# Altium PCB DSP大板子.PcbDoc (part 2 of 9)
Units mil, origin at the board's own origin, x right, y up, seen from the top; angles counter-clockwise.
Board outline 7874.02 x 9055.12 mil, 4 copper layers (Top Layer, GND02, PWR03, Bottom Layer), stack 23.756 mil thick; 656 components, 360 nets, 1967 pads, 2623 vias.
Unrouted connection lines stored in the file: 70.
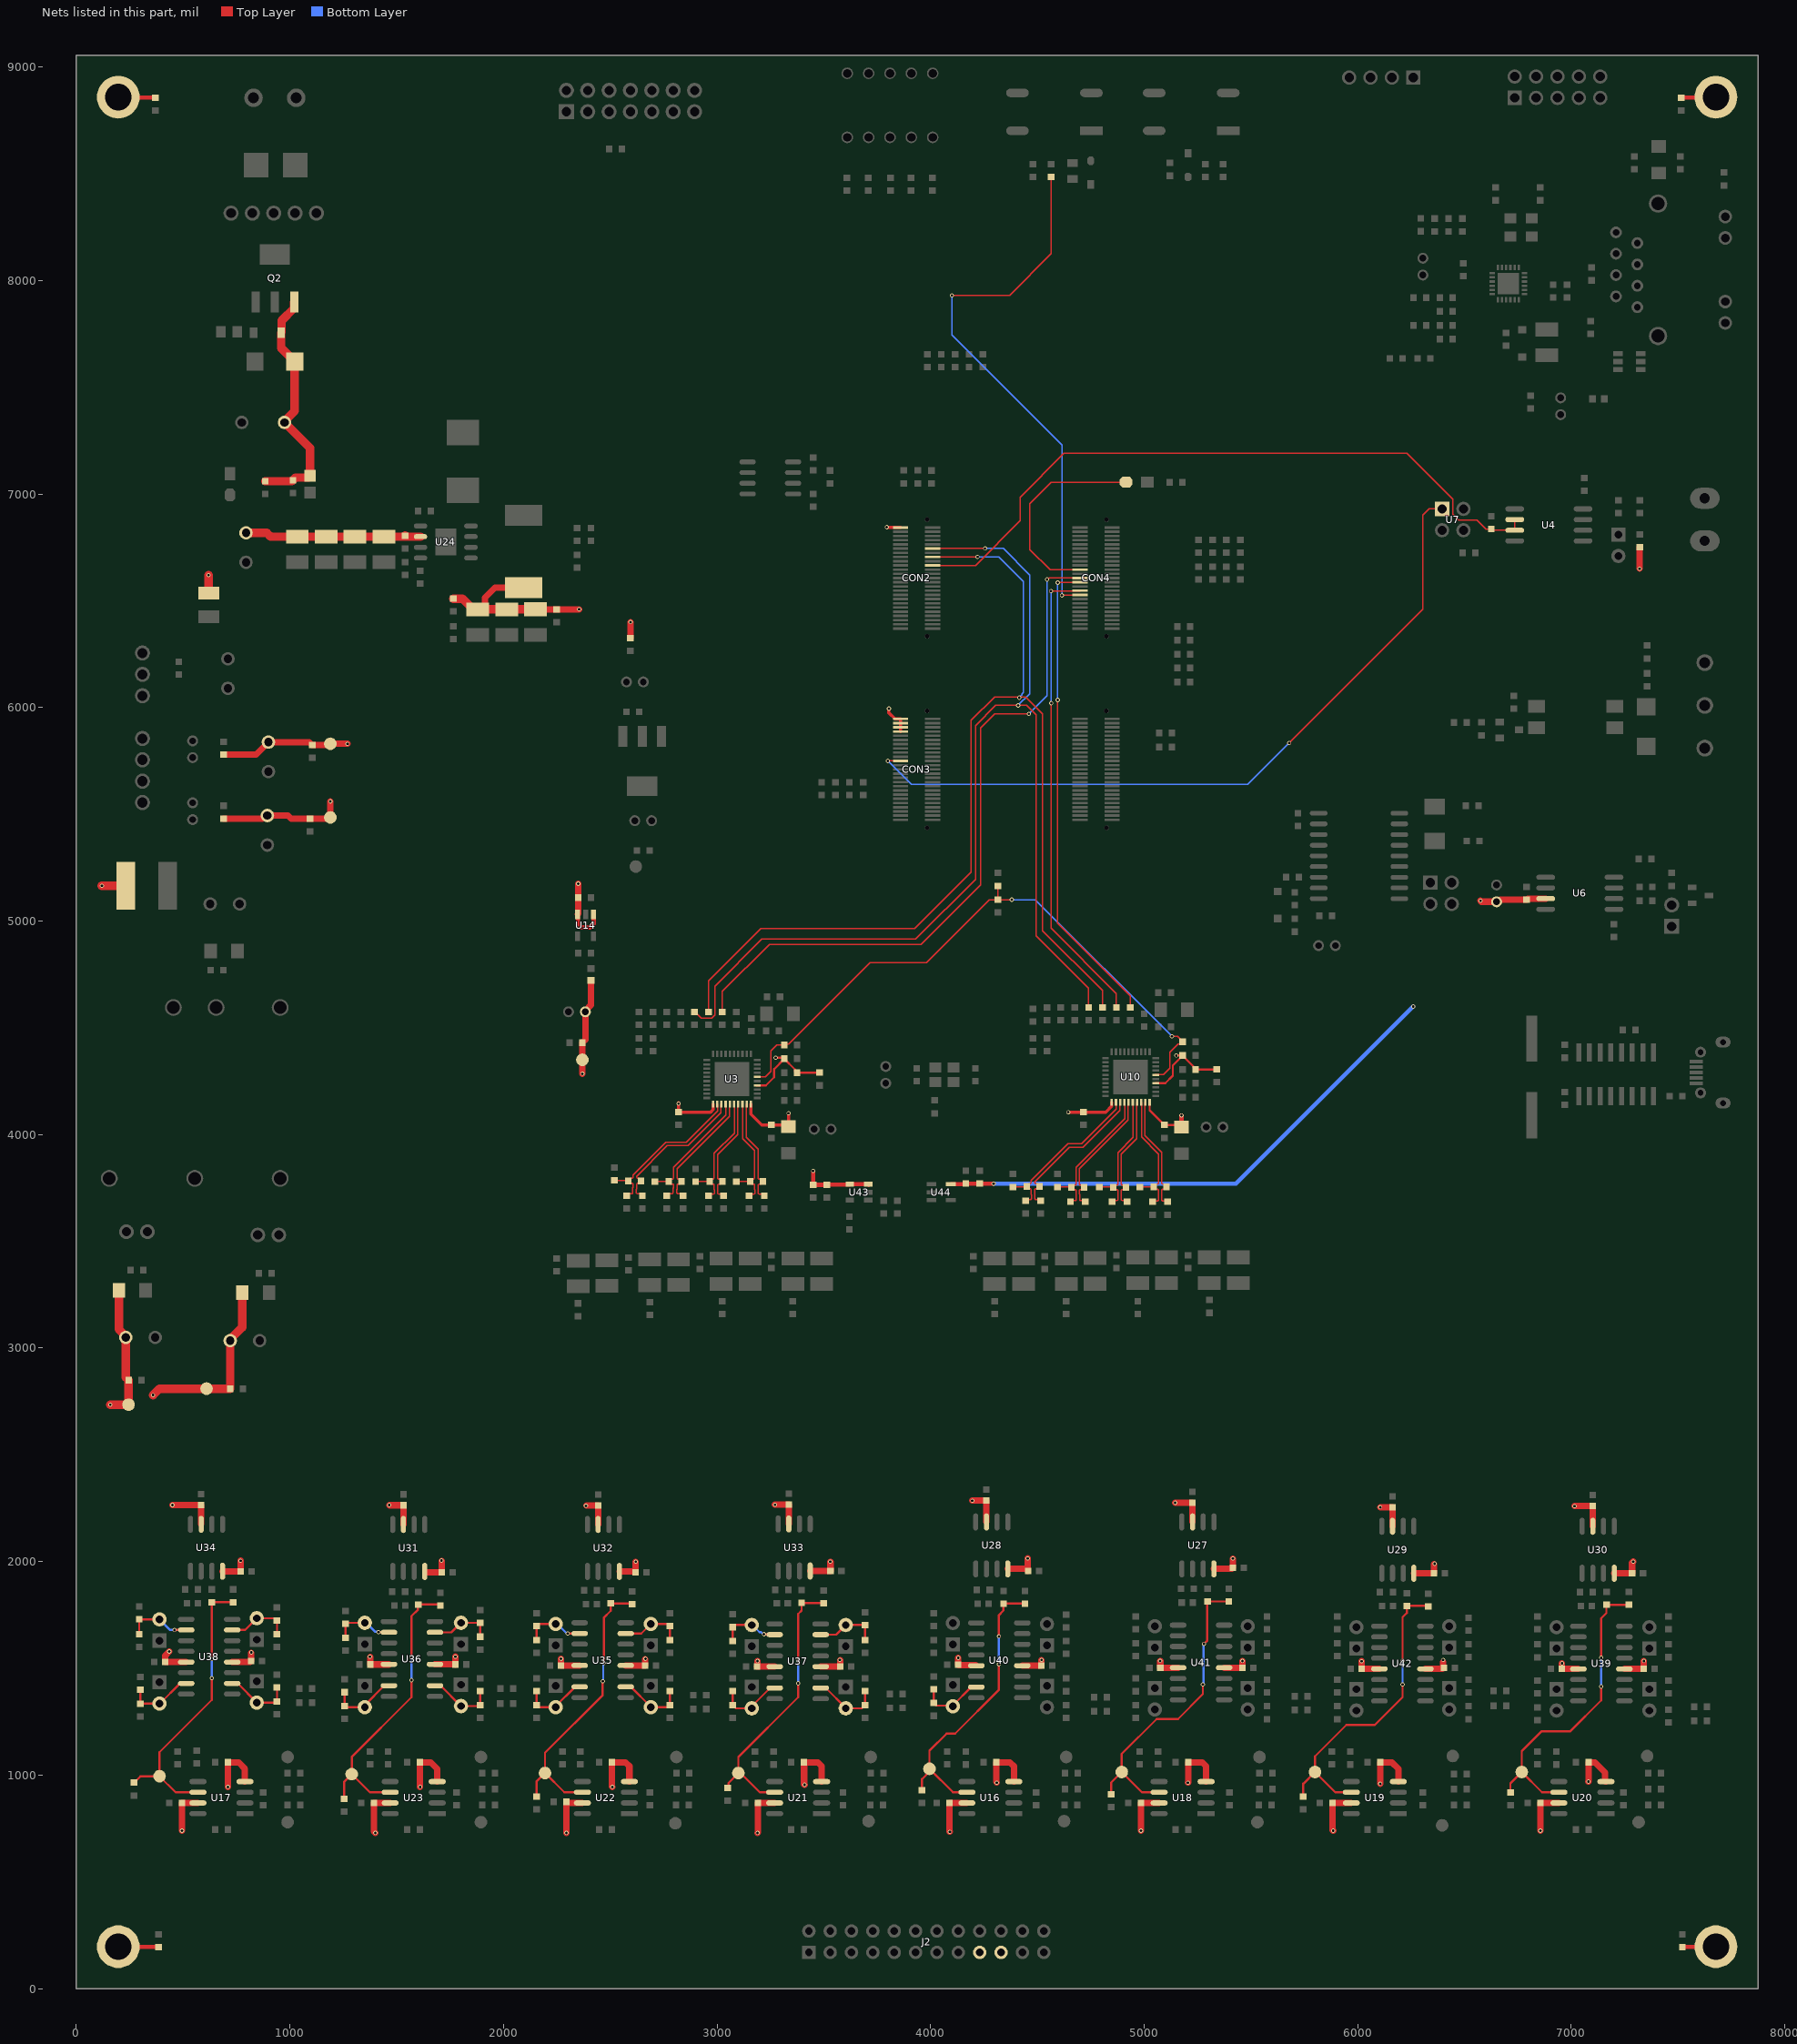
[diagram p4: the nets of this part, all layers, seen from the top]

## Part data
1 2 3 4 5 6 7 8 9 10 11 12 13 14 15 16 17 18 19 20 21 22 23 24 +12 +15 -1 -12 -15 T1: library part TEST-POINT, "测试点"
BOOT1: library part "5BIT DIP SOP Switch", Manufacturer=KE, Manufacturer PartNumber=DSWB05LHGET, Remark="5位直插拨码开关 红色,2.54mm"
C1 C17 C35 C36 C40 C76 C77 C87 C88 C89 C90 C91 C92 C93 C94 C95 C96 C97 C98 C99 C100 C101 C107 C121 C122 C124 C125 C126 C127 C128 C129 C130 C131 C132 C133 C134 C135 C136 C137 C146 C147 C148 C149 C150 C151 C152 C153 C158 C159 C160 C161 C162 C163 C164 C165 C166 C167 C168 C169 C170 C171 C173 C174 C181 C182 C183 C184 C185 C186 C187 C188 C189 C190 C191 C192 C193 C194 C195 C196: library part C, "贴片电容", BOM名称=无极性贴片电容, 唯一出售店铺网址=https://shop463601444.taobao.com, 淘宝ID="封装库来自淘宝 ID：黄晶宝石", 联系售后，技术支持=https://shop463601444.taobao.com
  C146: AddInBom=yes, DesignItemID=C, Device=C, FootprintName="C 0603_L", LibraryName="0.1 - 电阻-电容-电感", Origin Footprint="C 0201_L", OriginFootprint 2="C 0402_L", OriginFootprint 3="C 0805_L", OriginFootprint 4="C 1206_L", OriginFootprint 5="C 1210_L", OriginFootprint 6="C 1808_L", OriginFootprint 7="C 1812_L", OriginFootprint 8="C 1825_L", OriginFootprint 9="C 2225_L", OriginFootprint 10="C 0201_M", OriginFootprint 11="C 0402_M", OriginFootprint 12="C 0603_M", OriginFootprint 13="C 0805_M", OriginFootprint 14="C 1206_M", OriginFootprint 15="C 1210_M", OriginFootprint 16="C 1808_M", OriginFootprint 17="C 1812_M", OriginFootprint 18="C 1825_M", OriginFootprint 19="C 2225_M", OriginModelName="C 0603", SymbolName=C, UniqueId=2b2365c2d0e3ae99
  C147: AddInBom=yes, DesignItemID=C, Device=C, FootprintName="C 0603_L", LibraryName="0.1 - 电阻-电容-电感", Origin Footprint="C 0201_L", OriginFootprint 2="C 0402_L", OriginFootprint 3="C 0805_L", OriginFootprint 4="C 1206_L", OriginFootprint 5="C 1210_L", OriginFootprint 6="C 1808_L", OriginFootprint 7="C 1812_L", OriginFootprint 8="C 1825_L", OriginFootprint 9="C 2225_L", OriginFootprint 10="C 0201_M", OriginFootprint 11="C 0402_M", OriginFootprint 12="C 0603_M", OriginFootprint 13="C 0805_M", OriginFootprint 14="C 1206_M", OriginFootprint 15="C 1210_M", OriginFootprint 16="C 1808_M", OriginFootprint 17="C 1812_M", OriginFootprint 18="C 1825_M", OriginFootprint 19="C 2225_M", OriginModelName="C 0603", SymbolName=C, UniqueId=2ac4a713bdb27458
  C148: AddInBom=yes, DesignItemID=C, Device=C, FootprintName="C 0603_L", LibraryName="0.1 - 电阻-电容-电感", Origin Footprint="C 0201_L", OriginFootprint 2="C 0402_L", OriginFootprint 3="C 0805_L", OriginFootprint 4="C 1206_L", OriginFootprint 5="C 1210_L", OriginFootprint 6="C 1808_L", OriginFootprint 7="C 1812_L", OriginFootprint 8="C 1825_L", OriginFootprint 9="C 2225_L", OriginFootprint 10="C 0201_M", OriginFootprint 11="C 0402_M", OriginFootprint 12="C 0603_M", OriginFootprint 13="C 0805_M", OriginFootprint 14="C 1206_M", OriginFootprint 15="C 1210_M", OriginFootprint 16="C 1808_M", OriginFootprint 17="C 1812_M", OriginFootprint 18="C 1825_M", OriginFootprint 19="C 2225_M", OriginModelName="C 0603", SymbolName=C, UniqueId=043006a40a259ae3
  C149: AddInBom=yes, DesignItemID=C, Device=C, FootprintName="C 0603_L", LibraryName="0.1 - 电阻-电容-电感", Origin Footprint="C 0201_L", OriginFootprint 2="C 0402_L", OriginFootprint 3="C 0805_L", OriginFootprint 4="C 1206_L", OriginFootprint 5="C 1210_L", OriginFootprint 6="C 1808_L", OriginFootprint 7="C 1812_L", OriginFootprint 8="C 1825_L", OriginFootprint 9="C 2225_L", OriginFootprint 10="C 0201_M", OriginFootprint 11="C 0402_M", OriginFootprint 12="C 0603_M", OriginFootprint 13="C 0805_M", OriginFootprint 14="C 1206_M", OriginFootprint 15="C 1210_M", OriginFootprint 16="C 1808_M", OriginFootprint 17="C 1812_M", OriginFootprint 18="C 1825_M", OriginFootprint 19="C 2225_M", OriginModelName="C 0603", SymbolName=C, UniqueId=ed052c5890e059ff
  C150: AddInBom=yes, DesignItemID=C, Device=C, FootprintName="C 0603_L", LibraryName="0.1 - 电阻-电容-电感", Origin Footprint="C 0201_L", OriginFootprint 2="C 0402_L", OriginFootprint 3="C 0805_L", OriginFootprint 4="C 1206_L", OriginFootprint 5="C 1210_L", OriginFootprint 6="C 1808_L", OriginFootprint 7="C 1812_L", OriginFootprint 8="C 1825_L", OriginFootprint 9="C 2225_L", OriginFootprint 10="C 0201_M", OriginFootprint 11="C 0402_M", OriginFootprint 12="C 0603_M", OriginFootprint 13="C 0805_M", OriginFootprint 14="C 1206_M", OriginFootprint 15="C 1210_M", OriginFootprint 16="C 1808_M", OriginFootprint 17="C 1812_M", OriginFootprint 18="C 1825_M", OriginFootprint 19="C 2225_M", OriginModelName="C 0603", SymbolName=C, UniqueId=e3aeb17489c0ab5d
  C151: AddInBom=yes, DesignItemID=C, Device=C, FootprintName="C 0603_L", LibraryName="0.1 - 电阻-电容-电感", Origin Footprint="C 0201_L", OriginFootprint 2="C 0402_L", OriginFootprint 3="C 0805_L", OriginFootprint 4="C 1206_L", OriginFootprint 5="C 1210_L", OriginFootprint 6="C 1808_L", OriginFootprint 7="C 1812_L", OriginFootprint 8="C 1825_L", OriginFootprint 9="C 2225_L", OriginFootprint 10="C 0201_M", OriginFootprint 11="C 0402_M", OriginFootprint 12="C 0603_M", OriginFootprint 13="C 0805_M", OriginFootprint 14="C 1206_M", OriginFootprint 15="C 1210_M", OriginFootprint 16="C 1808_M", OriginFootprint 17="C 1812_M", OriginFootprint 18="C 1825_M", OriginFootprint 19="C 2225_M", OriginModelName="C 0603", SymbolName=C, UniqueId=cc1d00c51cc12124
  C152: AddInBom=yes, DesignItemID=C, Device=C, FootprintName="C 0603_L", LibraryName="0.1 - 电阻-电容-电感", Origin Footprint="C 0201_L", OriginFootprint 2="C 0402_L", OriginFootprint 3="C 0805_L", OriginFootprint 4="C 1206_L", OriginFootprint 5="C 1210_L", OriginFootprint 6="C 1808_L", OriginFootprint 7="C 1812_L", OriginFootprint 8="C 1825_L", OriginFootprint 9="C 2225_L", OriginFootprint 10="C 0201_M", OriginFootprint 11="C 0402_M", OriginFootprint 12="C 0603_M", OriginFootprint 13="C 0805_M", OriginFootprint 14="C 1206_M", OriginFootprint 15="C 1210_M", OriginFootprint 16="C 1808_M", OriginFootprint 17="C 1812_M", OriginFootprint 18="C 1825_M", OriginFootprint 19="C 2225_M", OriginModelName="C 0603", SymbolName=C, UniqueId=d2625f4b4bd439ef
  C153: AddInBom=yes, DesignItemID=C, Device=C, FootprintName="C 0603_L", LibraryName="0.1 - 电阻-电容-电感", Origin Footprint="C 0201_L", OriginFootprint 2="C 0402_L", OriginFootprint 3="C 0805_L", OriginFootprint 4="C 1206_L", OriginFootprint 5="C 1210_L", OriginFootprint 6="C 1808_L", OriginFootprint 7="C 1812_L", OriginFootprint 8="C 1825_L", OriginFootprint 9="C 2225_L", OriginFootprint 10="C 0201_M", OriginFootprint 11="C 0402_M", OriginFootprint 12="C 0603_M", OriginFootprint 13="C 0805_M", OriginFootprint 14="C 1206_M", OriginFootprint 15="C 1210_M", OriginFootprint 16="C 1808_M", OriginFootprint 17="C 1812_M", OriginFootprint 18="C 1825_M", OriginFootprint 19="C 2225_M", OriginModelName="C 0603", SymbolName=C, UniqueId=a26eb100929f0697
  C158: AddInBom=yes, DesignItemID=C, Device=C, FootprintName="C 0603_L", LibraryName="0.1 - 电阻-电容-电感", Origin Footprint="C 0201_L", OriginFootprint 2="C 0402_L", OriginFootprint 3="C 0805_L", OriginFootprint 4="C 1206_L", OriginFootprint 5="C 1210_L", OriginFootprint 6="C 1808_L", OriginFootprint 7="C 1812_L", OriginFootprint 8="C 1825_L", OriginFootprint 9="C 2225_L", OriginFootprint 10="C 0201_M", OriginFootprint 11="C 0402_M", OriginFootprint 12="C 0603_M", OriginFootprint 13="C 0805_M", OriginFootprint 14="C 1206_M", OriginFootprint 15="C 1210_M", OriginFootprint 16="C 1808_M", OriginFootprint 17="C 1812_M", OriginFootprint 18="C 1825_M", OriginFootprint 19="C 2225_M", OriginModelName="C 0603", SymbolName=C, UniqueId=6158349470ed1956
  C159: AddInBom=yes, DesignItemID=C, Device=C, FootprintName="C 0603_L", LibraryName="0.1 - 电阻-电容-电感", Origin Footprint="C 0201_L", OriginFootprint 2="C 0402_L", OriginFootprint 3="C 0805_L", OriginFootprint 4="C 1206_L", OriginFootprint 5="C 1210_L", OriginFootprint 6="C 1808_L", OriginFootprint 7="C 1812_L", OriginFootprint 8="C 1825_L", OriginFootprint 9="C 2225_L", OriginFootprint 10="C 0201_M", OriginFootprint 11="C 0402_M", OriginFootprint 12="C 0603_M", OriginFootprint 13="C 0805_M", OriginFootprint 14="C 1206_M", OriginFootprint 15="C 1210_M", OriginFootprint 16="C 1808_M", OriginFootprint 17="C 1812_M", OriginFootprint 18="C 1825_M", OriginFootprint 19="C 2225_M", OriginModelName="C 0603", SymbolName=C, UniqueId=de488198406d19e5
  C160: AddInBom=yes, DesignItemID=C, Device=C, FootprintName="C 0603_L", LibraryName="0.1 - 电阻-电容-电感", Origin Footprint="C 0201_L", OriginFootprint 2="C 0402_L", OriginFootprint 3="C 0805_L", OriginFootprint 4="C 1206_L", OriginFootprint 5="C 1210_L", OriginFootprint 6="C 1808_L", OriginFootprint 7="C 1812_L", OriginFootprint 8="C 1825_L", OriginFootprint 9="C 2225_L", OriginFootprint 10="C 0201_M", OriginFootprint 11="C 0402_M", OriginFootprint 12="C 0603_M", OriginFootprint 13="C 0805_M", OriginFootprint 14="C 1206_M", OriginFootprint 15="C 1210_M", OriginFootprint 16="C 1808_M", OriginFootprint 17="C 1812_M", OriginFootprint 18="C 1825_M", OriginFootprint 19="C 2225_M", OriginModelName="C 0603", SymbolName=C, UniqueId=ac7cf9eb5671d2c3
  C161: AddInBom=yes, DesignItemID=C, Device=C, FootprintName="C 0603_L", LibraryName="0.1 - 电阻-电容-电感", Origin Footprint="C 0201_L", OriginFootprint 2="C 0402_L", OriginFootprint 3="C 0805_L", OriginFootprint 4="C 1206_L", OriginFootprint 5="C 1210_L", OriginFootprint 6="C 1808_L", OriginFootprint 7="C 1812_L", OriginFootprint 8="C 1825_L", OriginFootprint 9="C 2225_L", OriginFootprint 10="C 0201_M", OriginFootprint 11="C 0402_M", OriginFootprint 12="C 0603_M", OriginFootprint 13="C 0805_M", OriginFootprint 14="C 1206_M", OriginFootprint 15="C 1210_M", OriginFootprint 16="C 1808_M", OriginFootprint 17="C 1812_M", OriginFootprint 18="C 1825_M", OriginFootprint 19="C 2225_M", OriginModelName="C 0603", SymbolName=C, UniqueId=5471cb5e6ead650e
  C162: AddInBom=yes, DesignItemID=C, Device=C, FootprintName="C 0603_L", LibraryName="0.1 - 电阻-电容-电感", Origin Footprint="C 0201_L", OriginFootprint 2="C 0402_L", OriginFootprint 3="C 0805_L", OriginFootprint 4="C 1206_L", OriginFootprint 5="C 1210_L", OriginFootprint 6="C 1808_L", OriginFootprint 7="C 1812_L", OriginFootprint 8="C 1825_L", OriginFootprint 9="C 2225_L", OriginFootprint 10="C 0201_M", OriginFootprint 11="C 0402_M", OriginFootprint 12="C 0603_M", OriginFootprint 13="C 0805_M", OriginFootprint 14="C 1206_M", OriginFootprint 15="C 1210_M", OriginFootprint 16="C 1808_M", OriginFootprint 17="C 1812_M", OriginFootprint 18="C 1825_M", OriginFootprint 19="C 2225_M", OriginModelName="C 0603", SymbolName=C, UniqueId=909660952e1a96fd
  C163: AddInBom=yes, DesignItemID=C, Device=C, FootprintName="C 0603_L", LibraryName="0.1 - 电阻-电容-电感", Origin Footprint="C 0201_L", OriginFootprint 2="C 0402_L", OriginFootprint 3="C 0805_L", OriginFootprint 4="C 1206_L", OriginFootprint 5="C 1210_L", OriginFootprint 6="C 1808_L", OriginFootprint 7="C 1812_L", OriginFootprint 8="C 1825_L", OriginFootprint 9="C 2225_L", OriginFootprint 10="C 0201_M", OriginFootprint 11="C 0402_M", OriginFootprint 12="C 0603_M", OriginFootprint 13="C 0805_M", OriginFootprint 14="C 1206_M", OriginFootprint 15="C 1210_M", OriginFootprint 16="C 1808_M", OriginFootprint 17="C 1812_M", OriginFootprint 18="C 1825_M", OriginFootprint 19="C 2225_M", OriginModelName="C 0603", SymbolName=C, UniqueId=7abe426619a81940
  C164: AddInBom=yes, DesignItemID=C, Device=C, FootprintName="C 0603_L", LibraryName="0.1 - 电阻-电容-电感", Origin Footprint="C 0201_L", OriginFootprint 2="C 0402_L", OriginFootprint 3="C 0805_L", OriginFootprint 4="C 1206_L", OriginFootprint 5="C 1210_L", OriginFootprint 6="C 1808_L", OriginFootprint 7="C 1812_L", OriginFootprint 8="C 1825_L", OriginFootprint 9="C 2225_L", OriginFootprint 10="C 0201_M", OriginFootprint 11="C 0402_M", OriginFootprint 12="C 0603_M", OriginFootprint 13="C 0805_M", OriginFootprint 14="C 1206_M", OriginFootprint 15="C 1210_M", OriginFootprint 16="C 1808_M", OriginFootprint 17="C 1812_M", OriginFootprint 18="C 1825_M", OriginFootprint 19="C 2225_M", OriginModelName="C 0603", SymbolName=C, UniqueId=f9bfd7a6531d354d
  C165: AddInBom=yes, DesignItemID=C, Device=C, FootprintName="C 0603_L", LibraryName="0.1 - 电阻-电容-电感", Origin Footprint="C 0201_L", OriginFootprint 2="C 0402_L", OriginFootprint 3="C 0805_L", OriginFootprint 4="C 1206_L", OriginFootprint 5="C 1210_L", OriginFootprint 6="C 1808_L", OriginFootprint 7="C 1812_L", OriginFootprint 8="C 1825_L", OriginFootprint 9="C 2225_L", OriginFootprint 10="C 0201_M", OriginFootprint 11="C 0402_M", OriginFootprint 12="C 0603_M", OriginFootprint 13="C 0805_M", OriginFootprint 14="C 1206_M", OriginFootprint 15="C 1210_M", OriginFootprint 16="C 1808_M", OriginFootprint 17="C 1812_M", OriginFootprint 18="C 1825_M", OriginFootprint 19="C 2225_M", OriginModelName="C 0603", SymbolName=C, UniqueId=ecf0d2211b923647
  C166: AddInBom=yes, DesignItemID=C, Device=C, FootprintName="C 0603_L", LibraryName="0.1 - 电阻-电容-电感", Origin Footprint="C 0201_L", OriginFootprint 2="C 0402_L", OriginFootprint 3="C 0805_L", OriginFootprint 4="C 1206_L", OriginFootprint 5="C 1210_L", OriginFootprint 6="C 1808_L", OriginFootprint 7="C 1812_L", OriginFootprint 8="C 1825_L", OriginFootprint 9="C 2225_L", OriginFootprint 10="C 0201_M", OriginFootprint 11="C 0402_M", OriginFootprint 12="C 0603_M", OriginFootprint 13="C 0805_M", OriginFootprint 14="C 1206_M", OriginFootprint 15="C 1210_M", OriginFootprint 16="C 1808_M", OriginFootprint 17="C 1812_M", OriginFootprint 18="C 1825_M", OriginFootprint 19="C 2225_M", OriginModelName="C 0603", SymbolName=C, UniqueId=a2ee6ceb65d30336
  C167: AddInBom=yes, DesignItemID=C, Device=C, FootprintName="C 0603_L", LibraryName="0.1 - 电阻-电容-电感", Origin Footprint="C 0201_L", OriginFootprint 2="C 0402_L", OriginFootprint 3="C 0805_L", OriginFootprint 4="C 1206_L", OriginFootprint 5="C 1210_L", OriginFootprint 6="C 1808_L", OriginFootprint 7="C 1812_L", OriginFootprint 8="C 1825_L", OriginFootprint 9="C 2225_L", OriginFootprint 10="C 0201_M", OriginFootprint 11="C 0402_M", OriginFootprint 12="C 0603_M", OriginFootprint 13="C 0805_M", OriginFootprint 14="C 1206_M", OriginFootprint 15="C 1210_M", OriginFootprint 16="C 1808_M", OriginFootprint 17="C 1812_M", OriginFootprint 18="C 1825_M", OriginFootprint 19="C 2225_M", OriginModelName="C 0603", SymbolName=C, UniqueId=ff078052695da6b6
  C168: AddInBom=yes, DesignItemID=C, Device=C, FootprintName="C 0603_L", LibraryName="0.1 - 电阻-电容-电感", Origin Footprint="C 0201_L", OriginFootprint 2="C 0402_L", OriginFootprint 3="C 0805_L", OriginFootprint 4="C 1206_L", OriginFootprint 5="C 1210_L", OriginFootprint 6="C 1808_L", OriginFootprint 7="C 1812_L", OriginFootprint 8="C 1825_L", OriginFootprint 9="C 2225_L", OriginFootprint 10="C 0201_M", OriginFootprint 11="C 0402_M", OriginFootprint 12="C 0603_M", OriginFootprint 13="C 0805_M", OriginFootprint 14="C 1206_M", OriginFootprint 15="C 1210_M", OriginFootprint 16="C 1808_M", OriginFootprint 17="C 1812_M", OriginFootprint 18="C 1825_M", OriginFootprint 19="C 2225_M", OriginModelName="C 0603", SymbolName=C, UniqueId=553def7d7947fca6
  C169: AddInBom=yes, DesignItemID=C, Device=C, FootprintName="C 0603_L", LibraryName="0.1 - 电阻-电容-电感", Origin Footprint="C 0201_L", OriginFootprint 2="C 0402_L", OriginFootprint 3="C 0805_L", OriginFootprint 4="C 1206_L", OriginFootprint 5="C 1210_L", OriginFootprint 6="C 1808_L", OriginFootprint 7="C 1812_L", OriginFootprint 8="C 1825_L", OriginFootprint 9="C 2225_L", OriginFootprint 10="C 0201_M", OriginFootprint 11="C 0402_M", OriginFootprint 12="C 0603_M", OriginFootprint 13="C 0805_M", OriginFootprint 14="C 1206_M", OriginFootprint 15="C 1210_M", OriginFootprint 16="C 1808_M", OriginFootprint 17="C 1812_M", OriginFootprint 18="C 1825_M", OriginFootprint 19="C 2225_M", OriginModelName="C 0603", SymbolName=C, UniqueId=54d3d224326b3f8f
  C170: AddInBom=yes, DesignItemID=C, Device=C, FootprintName="C 0603_L", LibraryName="0.1 - 电阻-电容-电感", Origin Footprint="C 0201_L", OriginFootprint 2="C 0402_L", OriginFootprint 3="C 0805_L", OriginFootprint 4="C 1206_L", OriginFootprint 5="C 1210_L", OriginFootprint 6="C 1808_L", OriginFootprint 7="C 1812_L", OriginFootprint 8="C 1825_L", OriginFootprint 9="C 2225_L", OriginFootprint 10="C 0201_M", OriginFootprint 11="C 0402_M", OriginFootprint 12="C 0603_M", OriginFootprint 13="C 0805_M", OriginFootprint 14="C 1206_M", OriginFootprint 15="C 1210_M", OriginFootprint 16="C 1808_M", OriginFootprint 17="C 1812_M", OriginFootprint 18="C 1825_M", OriginFootprint 19="C 2225_M", OriginModelName="C 0603", SymbolName=C, UniqueId=2b4e6e580c7acde0
  C171: AddInBom=yes, DesignItemID=C, Device=C, FootprintName="C 0603_L", LibraryName="0.1 - 电阻-电容-电感", Origin Footprint="C 0201_L", OriginFootprint 2="C 0402_L", OriginFootprint 3="C 0805_L", OriginFootprint 4="C 1206_L", OriginFootprint 5="C 1210_L", OriginFootprint 6="C 1808_L", OriginFootprint 7="C 1812_L", OriginFootprint 8="C 1825_L", OriginFootprint 9="C 2225_L", OriginFootprint 10="C 0201_M", OriginFootprint 11="C 0402_M", OriginFootprint 12="C 0603_M", OriginFootprint 13="C 0805_M", OriginFootprint 14="C 1206_M", OriginFootprint 15="C 1210_M", OriginFootprint 16="C 1808_M", OriginFootprint 17="C 1812_M", OriginFootprint 18="C 1825_M", OriginFootprint 19="C 2225_M", OriginModelName="C 0603", SymbolName=C, UniqueId=12af2948e5a85261
  C173: AddInBom=yes, DesignItemID=C, Device=C, FootprintName="C 0603_L", LibraryName="0.1 - 电阻-电容-电感", Origin Footprint="C 0201_L", OriginFootprint 2="C 0402_L", OriginFootprint 3="C 0805_L", OriginFootprint 4="C 1206_L", OriginFootprint 5="C 1210_L", OriginFootprint 6="C 1808_L", OriginFootprint 7="C 1812_L", OriginFootprint 8="C 1825_L", OriginFootprint 9="C 2225_L", OriginFootprint 10="C 0201_M", OriginFootprint 11="C 0402_M", OriginFootprint 12="C 0603_M", OriginFootprint 13="C 0805_M", OriginFootprint 14="C 1206_M", OriginFootprint 15="C 1210_M", OriginFootprint 16="C 1808_M", OriginFootprint 17="C 1812_M", OriginFootprint 18="C 1825_M", OriginFootprint 19="C 2225_M", OriginModelName="C 0603", SymbolName=C, UniqueId=5bfcee5f0e3d202c
  C174: AddInBom=yes, DesignItemID=C, Device=C, FootprintName="C 0603_L", LibraryName="0.1 - 电阻-电容-电感", Origin Footprint="C 0201_L", OriginFootprint 2="C 0402_L", OriginFootprint 3="C 0805_L", OriginFootprint 4="C 1206_L", OriginFootprint 5="C 1210_L", OriginFootprint 6="C 1808_L", OriginFootprint 7="C 1812_L", OriginFootprint 8="C 1825_L", OriginFootprint 9="C 2225_L", OriginFootprint 10="C 0201_M", OriginFootprint 11="C 0402_M", OriginFootprint 12="C 0603_M", OriginFootprint 13="C 0805_M", OriginFootprint 14="C 1206_M", OriginFootprint 15="C 1210_M", OriginFootprint 16="C 1808_M", OriginFootprint 17="C 1812_M", OriginFootprint 18="C 1825_M", OriginFootprint 19="C 2225_M", OriginModelName="C 0603", SymbolName=C, UniqueId=3db1f6a400993974
  C181: AddInBom=yes, DesignItemID=C, Device=C, FootprintName="C 0603_L", LibraryName="0.1 - 电阻-电容-电感", Origin Footprint="C 0201_L", OriginFootprint 2="C 0402_L", OriginFootprint 3="C 0805_L", OriginFootprint 4="C 1206_L", OriginFootprint 5="C 1210_L", OriginFootprint 6="C 1808_L", OriginFootprint 7="C 1812_L", OriginFootprint 8="C 1825_L", OriginFootprint 9="C 2225_L", OriginFootprint 10="C 0201_M", OriginFootprint 11="C 0402_M", OriginFootprint 12="C 0603_M", OriginFootprint 13="C 0805_M", OriginFootprint 14="C 1206_M", OriginFootprint 15="C 1210_M", OriginFootprint 16="C 1808_M", OriginFootprint 17="C 1812_M", OriginFootprint 18="C 1825_M", OriginFootprint 19="C 2225_M", OriginModelName="C 0603", SymbolName=C, UniqueId=e068690e94c157bc
  C182: AddInBom=yes, DesignItemID=C, Device=C, FootprintName="C 0603_L", LibraryName="0.1 - 电阻-电容-电感", Origin Footprint="C 0201_L", OriginFootprint 2="C 0402_L", OriginFootprint 3="C 0805_L", OriginFootprint 4="C 1206_L", OriginFootprint 5="C 1210_L", OriginFootprint 6="C 1808_L", OriginFootprint 7="C 1812_L", OriginFootprint 8="C 1825_L", OriginFootprint 9="C 2225_L", OriginFootprint 10="C 0201_M", OriginFootprint 11="C 0402_M", OriginFootprint 12="C 0603_M", OriginFootprint 13="C 0805_M", OriginFootprint 14="C 1206_M", OriginFootprint 15="C 1210_M", OriginFootprint 16="C 1808_M", OriginFootprint 17="C 1812_M", OriginFootprint 18="C 1825_M", OriginFootprint 19="C 2225_M", OriginModelName="C 0603", SymbolName=C, UniqueId=60b913fe2234996d
  C183: AddInBom=yes, DesignItemID=C, Device=C, FootprintName="C 0603_L", LibraryName="0.1 - 电阻-电容-电感", Origin Footprint="C 0201_L", OriginFootprint 2="C 0402_L", OriginFootprint 3="C 0805_L", OriginFootprint 4="C 1206_L", OriginFootprint 5="C 1210_L", OriginFootprint 6="C 1808_L", OriginFootprint 7="C 1812_L", OriginFootprint 8="C 1825_L", OriginFootprint 9="C 2225_L", OriginFootprint 10="C 0201_M", OriginFootprint 11="C 0402_M", OriginFootprint 12="C 0603_M", OriginFootprint 13="C 0805_M", OriginFootprint 14="C 1206_M", OriginFootprint 15="C 1210_M", OriginFootprint 16="C 1808_M", OriginFootprint 17="C 1812_M", OriginFootprint 18="C 1825_M", OriginFootprint 19="C 2225_M", OriginModelName="C 0603", SymbolName=C, UniqueId=09d5d64189419707
  C184: AddInBom=yes, DesignItemID=C, Device=C, FootprintName="C 0603_L", LibraryName="0.1 - 电阻-电容-电感", Origin Footprint="C 0201_L", OriginFootprint 2="C 0402_L", OriginFootprint 3="C 0805_L", OriginFootprint 4="C 1206_L", OriginFootprint 5="C 1210_L", OriginFootprint 6="C 1808_L", OriginFootprint 7="C 1812_L", OriginFootprint 8="C 1825_L", OriginFootprint 9="C 2225_L", OriginFootprint 10="C 0201_M", OriginFootprint 11="C 0402_M", OriginFootprint 12="C 0603_M", OriginFootprint 13="C 0805_M", OriginFootprint 14="C 1206_M", OriginFootprint 15="C 1210_M", OriginFootprint 16="C 1808_M", OriginFootprint 17="C 1812_M", OriginFootprint 18="C 1825_M", OriginFootprint 19="C 2225_M", OriginModelName="C 0603", SymbolName=C, UniqueId=a4fa6dbd8546cc48
  C185: AddInBom=yes, DesignItemID=C, Device=C, FootprintName="C 0603_L", LibraryName="0.1 - 电阻-电容-电感", Origin Footprint="C 0201_L", OriginFootprint 2="C 0402_L", OriginFootprint 3="C 0805_L", OriginFootprint 4="C 1206_L", OriginFootprint 5="C 1210_L", OriginFootprint 6="C 1808_L", OriginFootprint 7="C 1812_L", OriginFootprint 8="C 1825_L", OriginFootprint 9="C 2225_L", OriginFootprint 10="C 0201_M", OriginFootprint 11="C 0402_M", OriginFootprint 12="C 0603_M", OriginFootprint 13="C 0805_M", OriginFootprint 14="C 1206_M", OriginFootprint 15="C 1210_M", OriginFootprint 16="C 1808_M", OriginFootprint 17="C 1812_M", OriginFootprint 18="C 1825_M", OriginFootprint 19="C 2225_M", OriginModelName="C 0603", SymbolName=C, UniqueId=5298304991856aac
  C186: AddInBom=yes, DesignItemID=C, Device=C, FootprintName="C 0603_L", LibraryName="0.1 - 电阻-电容-电感", Origin Footprint="C 0201_L", OriginFootprint 2="C 0402_L", OriginFootprint 3="C 0805_L", OriginFootprint 4="C 1206_L", OriginFootprint 5="C 1210_L", OriginFootprint 6="C 1808_L", OriginFootprint 7="C 1812_L", OriginFootprint 8="C 1825_L", OriginFootprint 9="C 2225_L", OriginFootprint 10="C 0201_M", OriginFootprint 11="C 0402_M", OriginFootprint 12="C 0603_M", OriginFootprint 13="C 0805_M", OriginFootprint 14="C 1206_M", OriginFootprint 15="C 1210_M", OriginFootprint 16="C 1808_M", OriginFootprint 17="C 1812_M", OriginFootprint 18="C 1825_M", OriginFootprint 19="C 2225_M", OriginModelName="C 0603", SymbolName=C, UniqueId=cd91d26fa4917fbf
  C187: AddInBom=yes, DesignItemID=C, Device=C, FootprintName="C 0603_L", LibraryName="0.1 - 电阻-电容-电感", Origin Footprint="C 0201_L", OriginFootprint 2="C 0402_L", OriginFootprint 3="C 0805_L", OriginFootprint 4="C 1206_L", OriginFootprint 5="C 1210_L", OriginFootprint 6="C 1808_L", OriginFootprint 7="C 1812_L", OriginFootprint 8="C 1825_L", OriginFootprint 9="C 2225_L", OriginFootprint 10="C 0201_M", OriginFootprint 11="C 0402_M", OriginFootprint 12="C 0603_M", OriginFootprint 13="C 0805_M", OriginFootprint 14="C 1206_M", OriginFootprint 15="C 1210_M", OriginFootprint 16="C 1808_M", OriginFootprint 17="C 1812_M", OriginFootprint 18="C 1825_M", OriginFootprint 19="C 2225_M", OriginModelName="C 0603", SymbolName=C, UniqueId=485846f0059d8f41
  C188: AddInBom=yes, DesignItemID=C, Device=C, FootprintName="C 0603_L", LibraryName="0.1 - 电阻-电容-电感", Origin Footprint="C 0201_L", OriginFootprint 2="C 0402_L", OriginFootprint 3="C 0805_L", OriginFootprint 4="C 1206_L", OriginFootprint 5="C 1210_L", OriginFootprint 6="C 1808_L", OriginFootprint 7="C 1812_L", OriginFootprint 8="C 1825_L", OriginFootprint 9="C 2225_L", OriginFootprint 10="C 0201_M", OriginFootprint 11="C 0402_M", OriginFootprint 12="C 0603_M", OriginFootprint 13="C 0805_M", OriginFootprint 14="C 1206_M", OriginFootprint 15="C 1210_M", OriginFootprint 16="C 1808_M", OriginFootprint 17="C 1812_M", OriginFootprint 18="C 1825_M", OriginFootprint 19="C 2225_M", OriginModelName="C 0603", SymbolName=C, UniqueId=7c578440d25b8116
  C189: AddInBom=yes, DesignItemID=C, Device=C, FootprintName="C 0603_L", LibraryName="0.1 - 电阻-电容-电感", Origin Footprint="C 0201_L", OriginFootprint 2="C 0402_L", OriginFootprint 3="C 0805_L", OriginFootprint 4="C 1206_L", OriginFootprint 5="C 1210_L", OriginFootprint 6="C 1808_L", OriginFootprint 7="C 1812_L", OriginFootprint 8="C 1825_L", OriginFootprint 9="C 2225_L", OriginFootprint 10="C 0201_M", OriginFootprint 11="C 0402_M", OriginFootprint 12="C 0603_M", OriginFootprint 13="C 0805_M", OriginFootprint 14="C 1206_M", OriginFootprint 15="C 1210_M", OriginFootprint 16="C 1808_M", OriginFootprint 17="C 1812_M", OriginFootprint 18="C 1825_M", OriginFootprint 19="C 2225_M", OriginModelName="C 0603", SymbolName=C, UniqueId=cc82bf2c2e22e605
  C190: AddInBom=yes, DesignItemID=C, Device=C, FootprintName="C 0603_L", LibraryName="0.1 - 电阻-电容-电感", Origin Footprint="C 0201_L", OriginFootprint 2="C 0402_L", OriginFootprint 3="C 0805_L", OriginFootprint 4="C 1206_L", OriginFootprint 5="C 1210_L", OriginFootprint 6="C 1808_L", OriginFootprint 7="C 1812_L", OriginFootprint 8="C 1825_L", OriginFootprint 9="C 2225_L", OriginFootprint 10="C 0201_M", OriginFootprint 11="C 0402_M", OriginFootprint 12="C 0603_M", OriginFootprint 13="C 0805_M", OriginFootprint 14="C 1206_M", OriginFootprint 15="C 1210_M", OriginFootprint 16="C 1808_M", OriginFootprint 17="C 1812_M", OriginFootprint 18="C 1825_M", OriginFootprint 19="C 2225_M", OriginModelName="C 0603", SymbolName=C, UniqueId=ab4a8fe24fad9fe4
  C191: AddInBom=yes, DesignItemID=C, Device=C, FootprintName="C 0603_L", LibraryName="0.1 - 电阻-电容-电感", Origin Footprint="C 0201_L", OriginFootprint 2="C 0402_L", OriginFootprint 3="C 0805_L", OriginFootprint 4="C 1206_L", OriginFootprint 5="C 1210_L", OriginFootprint 6="C 1808_L", OriginFootprint 7="C 1812_L", OriginFootprint 8="C 1825_L", OriginFootprint 9="C 2225_L", OriginFootprint 10="C 0201_M", OriginFootprint 11="C 0402_M", OriginFootprint 12="C 0603_M", OriginFootprint 13="C 0805_M", OriginFootprint 14="C 1206_M", OriginFootprint 15="C 1210_M", OriginFootprint 16="C 1808_M", OriginFootprint 17="C 1812_M", OriginFootprint 18="C 1825_M", OriginFootprint 19="C 2225_M", OriginModelName="C 0603", SymbolName=C, UniqueId=9b91e7356bb9865f
  C192: AddInBom=yes, DesignItemID=C, Device=C, FootprintName="C 0603_L", LibraryName="0.1 - 电阻-电容-电感", Origin Footprint="C 0201_L", OriginFootprint 2="C 0402_L", OriginFootprint 3="C 0805_L", OriginFootprint 4="C 1206_L", OriginFootprint 5="C 1210_L", OriginFootprint 6="C 1808_L", OriginFootprint 7="C 1812_L", OriginFootprint 8="C 1825_L", OriginFootprint 9="C 2225_L", OriginFootprint 10="C 0201_M", OriginFootprint 11="C 0402_M", OriginFootprint 12="C 0603_M", OriginFootprint 13="C 0805_M", OriginFootprint 14="C 1206_M", OriginFootprint 15="C 1210_M", OriginFootprint 16="C 1808_M", OriginFootprint 17="C 1812_M", OriginFootprint 18="C 1825_M", OriginFootprint 19="C 2225_M", OriginModelName="C 0603", SymbolName=C, UniqueId=4b556904310d1556
  C193: AddInBom=yes, DesignItemID=C, Device=C, FootprintName="C 0603_L", LibraryName="0.1 - 电阻-电容-电感", Origin Footprint="C 0201_L", OriginFootprint 2="C 0402_L", OriginFootprint 3="C 0805_L", OriginFootprint 4="C 1206_L", OriginFootprint 5="C 1210_L", OriginFootprint 6="C 1808_L", OriginFootprint 7="C 1812_L", OriginFootprint 8="C 1825_L", OriginFootprint 9="C 2225_L", OriginFootprint 10="C 0201_M", OriginFootprint 11="C 0402_M", OriginFootprint 12="C 0603_M", OriginFootprint 13="C 0805_M", OriginFootprint 14="C 1206_M", OriginFootprint 15="C 1210_M", OriginFootprint 16="C 1808_M", OriginFootprint 17="C 1812_M", OriginFootprint 18="C 1825_M", OriginFootprint 19="C 2225_M", OriginModelName="C 0603", SymbolName=C, UniqueId=af7046427a4bfdfb
  C194: AddInBom=yes, DesignItemID=C, Device=C, FootprintName="C 0603_L", LibraryName="0.1 - 电阻-电容-电感", Origin Footprint="C 0201_L", OriginFootprint 2="C 0402_L", OriginFootprint 3="C 0805_L", OriginFootprint 4="C 1206_L", OriginFootprint 5="C 1210_L", OriginFootprint 6="C 1808_L", OriginFootprint 7="C 1812_L", OriginFootprint 8="C 1825_L", OriginFootprint 9="C 2225_L", OriginFootprint 10="C 0201_M", OriginFootprint 11="C 0402_M", OriginFootprint 12="C 0603_M", OriginFootprint 13="C 0805_M", OriginFootprint 14="C 1206_M", OriginFootprint 15="C 1210_M", OriginFootprint 16="C 1808_M", OriginFootprint 17="C 1812_M", OriginFootprint 18="C 1825_M", OriginFootprint 19="C 2225_M", OriginModelName="C 0603", SymbolName=C, UniqueId=65328433fb04ddb7
  C195: AddInBom=yes, DesignItemID=C, Device=C, FootprintName="C 0603_L", LibraryName="0.1 - 电阻-电容-电感", Origin Footprint="C 0201_L", OriginFootprint 2="C 0402_L", OriginFootprint 3="C 0805_L", OriginFootprint 4="C 1206_L", OriginFootprint 5="C 1210_L", OriginFootprint 6="C 1808_L", OriginFootprint 7="C 1812_L", OriginFootprint 8="C 1825_L", OriginFootprint 9="C 2225_L", OriginFootprint 10="C 0201_M", OriginFootprint 11="C 0402_M", OriginFootprint 12="C 0603_M", OriginFootprint 13="C 0805_M", OriginFootprint 14="C 1206_M", OriginFootprint 15="C 1210_M", OriginFootprint 16="C 1808_M", OriginFootprint 17="C 1812_M", OriginFootprint 18="C 1825_M", OriginFootprint 19="C 2225_M", OriginModelName="C 0603", SymbolName=C, UniqueId=deb55bbe20a101cf
  C196: AddInBom=yes, DesignItemID=C, Device=C, FootprintName="C 0603_L", LibraryName="0.1 - 电阻-电容-电感", Origin Footprint="C 0201_L", OriginFootprint 2="C 0402_L", OriginFootprint 3="C 0805_L", OriginFootprint 4="C 1206_L", OriginFootprint 5="C 1210_L", OriginFootprint 6="C 1808_L", OriginFootprint 7="C 1812_L", OriginFootprint 8="C 1825_L", OriginFootprint 9="C 2225_L", OriginFootprint 10="C 0201_M", OriginFootprint 11="C 0402_M", OriginFootprint 12="C 0603_M", OriginFootprint 13="C 0805_M", OriginFootprint 14="C 1206_M", OriginFootprint 15="C 1210_M", OriginFootprint 16="C 1808_M", OriginFootprint 17="C 1812_M", OriginFootprint 18="C 1825_M", OriginFootprint 19="C 2225_M", OriginModelName="C 0603", SymbolName=C, UniqueId=6827ca7a6bd67e26
C2 C4 C5 C7 C8 C9 C11 C13 C14 C16 C18 C19 C21 C26 C28 C30 C31 C34 C38 C39 C45 C46 C49 C50 C51 C60 C61 C62 C64 C66 C68 C71 C78 C79 C81 C86 C108 C109 C110 C111 C117 C118 C119 C139 C143 C145 C154 C155 C157 C175 C180 C197 C198 C199 C200: library part C, "无极性贴片电容", BOM名称=无极性贴片电容, 学习资源=www.ooocke.com, 版权归属=源创客
C3 C6 C12 C15 C20 C25 C33 C37 C41 C44 C47 C48 C53 C55 C59 C67 C70: library part fs32x106k101egg, "容值:10uF;精度:±10%;额定电压:100V;温度系数:X7R;", JLCPCB Part Class="Extended Part", LCSC Part Name="10uF ±10% 100V", Manufacturer=PSA(信昌电陶), ManufacturerPart=FS32X106K101EGG, Temperature Coefficient=X7R, Tolerance=±10%, Voltage Rating=100V, AddInBom=yes, ConvertToPcb=yes, Datasheet=https://item.szlcsc.com/datasheet/FS32X106K101EGG/5791227.html, FootprintName=C1210, ModelId=833068e7fe044595a6eec77c56179455, ModelName=C1210_L3.2-W2.5-H2.5, ModelTransform=125.984,98.425,0,0,0,0,0,0,0, Supplier=LCSC, Supplier Footprint=1210, SupplierPart=C5156756, Symbol=FS32X106K101EGG
C10 C29 C63 C80: library part CAP_2
C22 C42 C54 C72 C82 C84: library part CAP
C23 C32 C52 C65 C69: library part cl31b106kahnnne, "容值:10uF;精度:±10%;额定电压:25V;温度系数:X7R;", JLCPCB Part Class="Extended Part", LCSC Part Name="10uF ±10% 25V", Manufacturer=SAMSUNG(三星), ManufacturerPart=CL31B106KAHNNNE, Temperature Coefficient=X7R, Tolerance=±10%, Voltage Rating=25V, AddInBom=yes, ConvertToPcb=yes, Datasheet=https://item.szlcsc.com/datasheet/CL31B106KAHNNNE/15532.html, FootprintName=C1206, ModelId=e4be705b945545a48e666415e3682bd8, ModelName=C1206_L3.2-W1.6-H1.3, ModelTransform=125.984,62.992,0,0,0,0,0,0,0, Supplier=LCSC, Supplier Footprint=1206, SupplierPart=C14860, Symbol=CL31B106KAHNNNE
C24 C27 C43 C56 C57 C58 C73 C74 C75 C83 C85: library part Cap, "Capacitor", LatestRevisionDate=17-Jul-2002, LatestRevisionNote="Re-released for DXP Platform.", Published=8-Jun-2000, Publisher="Altium Limited"
C102: library part rxw470m1jbk-0811p, "容值:47uF;精度:±20%;额定电压:63V;纹波电流:405mA@100kHz;等效串联电阻(ESR):342mΩ@100kHz;", Equivalent Series Resistance(ESR)=342mΩ@100kHz, JLCPCB Part Class="Extended Part", LCSC Part Name="47uF ±20% 63V", Manufacturer=Lelon(立隆), ManufacturerPart=RXW470M1JBK-0811P, Ripple Current=405mA@100kHz, Tolerance=±20%, Voltage Rating=63V, AddInBom=yes, ConvertToPcb=yes, Datasheet=https://item.szlcsc.com/datasheet/RXW470M1JBK-0811P/145966.html, Diameter=8mm, FootprintName=CAP-TH_BD8.0-P3.50-D0.6-FD, Height - Seated (Max)=11.5mm, Lifetime=5000hrs@105℃, ModelId=a2c936ec27754f809f3966430e36f767, ModelName=CAP-TH_D8.0-H8.0-P3.50, ModelTransform=314.96,314.862,0,180,0,0,0,0,-137.795, Pin Spacing=3.5mm, Supplier=LCSC, Supplier Footprint=插件,D8xL11.5mm, SupplierPart=C134656, Symbol=RXW470M1JBK-0811P
C103 C104 C105 C106 C114 C115 C116: library part fs32x225k101egg, "容值:2.2uF;精度:±10%;额定电压:100V;温度系数:X7R;", JLCPCB Part Class="Extended Part", LCSC Part Name="2.2uF ±10% 100V", Manufacturer=PSA(信昌电陶), ManufacturerPart=FS32X225K101EGG, Temperature Coefficient=X7R, Tolerance=±10%, Voltage Rating=100V, AddInBom=yes, ConvertToPcb=yes, Datasheet=https://item.szlcsc.com/datasheet/FS32X225K101EGG/164378.html, FootprintName=C1210, ModelId=833068e7fe044595a6eec77c56179455, ModelName=C1210_L3.2-W2.5-H2.5, ModelTransform=125.984,98.425,0,0,0,0,0,0,0, Supplier=LCSC, Supplier Footprint=1210, SupplierPart=C153036, Symbol=FS32X225K101EGG
C112 C123: library part 100yxj10m6.3x11, "容值:10uF;精度:±20%;额定电压:100V;纹波电流:112.14mA@120Hz;等效串联电阻(ESR):570mΩ;", Equivalent Series Resistance(ESR)=570mΩ, JLCPCB Part Class="Extended Part", LCSC Part Name="10uF ±20% 100V", Manufacturer=Rubycon(红宝石), ManufacturerPart=100YXJ10M6.3X11, Operating Temperature=-40℃~+105℃, Ripple Current=112.14mA@120Hz, Tolerance=±20%, Voltage Rating=100V, AddInBom=yes, ConvertToPcb=yes, Diameter=6.3mm, FootprintName=CAP-TH_BD6.3-P2.50-D0.6-FD, Height - Seated (Max)=11mm, Lifetime=7000hrs@105℃, ModelId=3cdd55eab6a840dba93006d5a727d063, ModelName=CAP-TH_BD6.3-P2.50-D0.6-FD, ModelTransform=247.778,247.90446,0,0,0,0,0,0,-137.795, Pin Spacing=2.5mm, Supplier=LCSC, Supplier Footprint=插件,D6.3xL11mm, SupplierPart=C1668981, Symbol=100YXJ10M6.3X11
C113 C120 C156: library part eeufr1h101, "容值:100uF;精度:±20%;额定电压:50V;纹波电流:870mA@100kHz;等效串联电阻(ESR):61mΩ@100kHz;", Equivalent Series Resistance(ESR)=61mΩ@100kHz, JLCPCB Part Class="Extended Part", LCSC Part Name="100uF ±20% 50V", Manufacturer=PANASONIC(松下), ManufacturerPart=EEUFR1H101, Operating Temperature=-40℃~+105℃, Ripple Current=870mA@100kHz, Tolerance=±20%, Voltage Rating=50V, AddInBom=yes, ConvertToPcb=yes, Datasheet=https://item.szlcsc.com/datasheet/EEUFR1H101/190095.html, Diameter=8mm, FootprintName=CAP-TH_BD8.0-P3.50-D0.6-FD_1, Height - Seated (Max)=11.5mm, Lifetime=6000hrs@105℃, ModelId=5fc21599cab34df2ad7753b19b2f5286, ModelName=CAP-TH_BD8.0-P3.50-D0.6-FD_1, ModelTransform=315.365,314.914,0,0,0,0,0,0,-196.85, Pin Spacing=3.5mm, Polarity type=有极性, Supplier=LCSC, Supplier Footprint=插件,D8xL11.5mm, SupplierPart=C178702, Symbol=EEUFR1H101
C138: library part CAP, "100µF/63V"
C140 C141: library part CAP, "10µF/25V"
C142 C144: library part CAP, "47µF/25V"
C172: library part cl31b475kbhnnne, "容值:4.7uF;精度:±10%;额定电压:50V;温度系数:X7R;", JLCPCB Part Class="Extended Part", LCSC Part Name="4.7uF ±10% 50V", Manufacturer=SAMSUNG(三星), ManufacturerPart=CL31B475KBHNNNE, Temperature Coefficient=X7R, Tolerance=±10%, Voltage Rating=50V, AddInBom=yes, ConvertToPcb=yes, Datasheet=https://item.szlcsc.com/datasheet/CL31B475KBHNNNE/52218.html, FootprintName=C1206, ModelId=e4be705b945545a48e666415e3682bd8, ModelName=C1206_L3.2-W1.6-H1.3, ModelTransform=125.984,62.992,0,0,0,0,0,0,0, Supplier=LCSC, Supplier Footprint=1206, SupplierPart=C51205, Symbol=CL31B475KBHNNNE
C178: library part eeufr1j221l, "容值:220uF;精度:±20%;额定电压:63V;纹波电流:1.5A@100kHz;等效串联电阻(ESR):33mΩ@100kHz;", Equivalent Series Resistance(ESR)=33mΩ@100kHz, JLCPCB Part Class="Extended Part", LCSC Part Name="220uF ±20% 63V", Manufacturer=PANASONIC(松下), ManufacturerPart=EEUFR1J221L, Operating Temperature=-40℃~+105℃, Ripple Current=1.5A@100kHz, Tolerance=±20%, Voltage Rating=63V, AddInBom=yes, ConvertToPcb=yes, Datasheet=https://item.szlcsc.com/datasheet/EEUFR1J221L/190105.html, Diameter=10mm, FootprintName=CAP-TH_BD10.0-P5.00-D1.0-FD, Height - Seated (Max)=25mm, Lifetime=10000hrs@105℃, ModelId=6ce78ce5315348e095d700085da75e48, ModelName=CAP-TH_D10.0-H16.0-P5.00, ModelTransform=394.094,393.72252,0,0,0,0,0,0,-137.795, Pin Spacing=5mm, Supplier=LCSC, Supplier Footprint=插件,D10xL25mm, SupplierPart=C178712, Symbol=EEUFR1J221L
C179: library part grm21br71h105ka12l, "容值:1uF;精度:±10%;额定电压:50V;温度系数:X7R;", JLCPCB Part Class="Extended Part", LCSC Part Name="1uF ±10% 50V", Manufacturer=muRata(村田), ManufacturerPart=GRM21BR71H105KA12L, Temperature Coefficient=X7R, Tolerance=±10%, Voltage Rating=50V, AddInBom=yes, ConvertToPcb=yes, Datasheet=https://item.szlcsc.com/datasheet/GRM21BR71H105KA12L/78210.html, FootprintName=C0805, ModelId=1ba041120af144c991958decab20d241, ModelName=C0805_L2.0-W1.3-H1.3, ModelTransform=78.74,51.181,0,0,0,0,0,0.0005,0, Supplier=LCSC, Supplier Footprint=0805, SupplierPart=C77083, Symbol=GRM21BR71H105KA12L
CON1 CON3: library part CON50A_0, Manufacturer=连科, Manufacturer PartNumber=NLWBS05-50C-2.2H, Remark="0.5mm 50P B2B 3.5mm合高 母头"
  CON1: ComponentLink1Description="New link"
CON2 CON4: library part CON50A_0, Manufacturer=连科, Manufacturer PartNumber=NLWBP05-50C-1.3H, Remark="0.5mm 50P B2B 3.5mm合高 公头"
CON5 JP1 JP2 JP3 JP4 JP5 JP6 JP7 JP8 JP9 JP10 JP11 JP12 JP13 JP14 JP15 JP16 JP17 JP18 JP19 JP20 JP21 JP22 JP23 JP24 JP25 JP26 JP27 JP28 JP29 JP30 JP31 JP32: library part "Header 2", "2P接插件", BOM名称=2P接插件
  CON5: 学习资源=https://shop463601444.taobao.com, 版权归属="封装库来自淘宝卖家 ID：黄晶宝石"
  JP1: AddInBom=yes, DesignItemID="Header 2", Device="Header 2", FootprintName=HDR2.54-LI-2P, LibraryName="5.4 - 接插件-脚距2.54 (100mil)", Origin Footprint=XH2.54-WI-2P, OriginFootprint 2=XH2.54-LI-2P, OriginFootprint 3=HDR2.54-M-LI-2P, OriginFootprint 4=HDR2.54-WI-2P, OriginFootprint 5=HDR2.54-WS-2P, OriginFootprint 6=HDR2.54-Y-LI-2P, OriginFootprint 7=HDR2.54-M-WS-2P, OriginFootprint 8=KF2510-LI-2P, OriginFootprint 9=XH2.54-WS-2P, OriginFootprint 10=XH2.54-LS-2P, OriginFootprint 11=KF2EDGK-2.54-LI-2P, OriginFootprint 12=KF2EDGK-2.54-WI-2P, OriginModelName=HDR2.54-1P, SymbolName="Header 2", UniqueId=307b99641c701ee0, 版权归属="封装库来自淘宝 ID：黄晶宝石", 联系售后=https://shop463601444.taobao.com
  JP2: AddInBom=yes, DesignItemID="Header 2", Device="Header 2", FootprintName=HDR2.54-LI-2P, LibraryName="5.4 - 接插件-脚距2.54 (100mil)", Origin Footprint=XH2.54-WI-2P, OriginFootprint 2=XH2.54-LI-2P, OriginFootprint 3=HDR2.54-M-LI-2P, OriginFootprint 4=HDR2.54-WI-2P, OriginFootprint 5=HDR2.54-WS-2P, OriginFootprint 6=HDR2.54-Y-LI-2P, OriginFootprint 7=HDR2.54-M-WS-2P, OriginFootprint 8=KF2510-LI-2P, OriginFootprint 9=XH2.54-WS-2P, OriginFootprint 10=XH2.54-LS-2P, OriginFootprint 11=KF2EDGK-2.54-LI-2P, OriginFootprint 12=KF2EDGK-2.54-WI-2P, OriginModelName=HDR2.54-1P, SymbolName="Header 2", UniqueId=62dfc6d8d4781687, 版权归属="封装库来自淘宝 ID：黄晶宝石", 联系售后=https://shop463601444.taobao.com
  JP3: AddInBom=yes, DesignItemID="Header 2", Device="Header 2", FootprintName=HDR2.54-LI-2P, LibraryName="5.4 - 接插件-脚距2.54 (100mil)", Origin Footprint=XH2.54-WI-2P, OriginFootprint 2=XH2.54-LI-2P, OriginFootprint 3=HDR2.54-M-LI-2P, OriginFootprint 4=HDR2.54-WI-2P, OriginFootprint 5=HDR2.54-WS-2P, OriginFootprint 6=HDR2.54-Y-LI-2P, OriginFootprint 7=HDR2.54-M-WS-2P, OriginFootprint 8=KF2510-LI-2P, OriginFootprint 9=XH2.54-WS-2P, OriginFootprint 10=XH2.54-LS-2P, OriginFootprint 11=KF2EDGK-2.54-LI-2P, OriginFootprint 12=KF2EDGK-2.54-WI-2P, OriginModelName=HDR2.54-1P, SymbolName="Header 2", UniqueId=7db8ea879d3067b5, 版权归属="封装库来自淘宝 ID：黄晶宝石", 联系售后=https://shop463601444.taobao.com
  JP4: AddInBom=yes, DesignItemID="Header 2", Device="Header 2", FootprintName=HDR2.54-LI-2P, LibraryName="5.4 - 接插件-脚距2.54 (100mil)", Origin Footprint=XH2.54-WI-2P, OriginFootprint 2=XH2.54-LI-2P, OriginFootprint 3=HDR2.54-M-LI-2P, OriginFootprint 4=HDR2.54-WI-2P, OriginFootprint 5=HDR2.54-WS-2P, OriginFootprint 6=HDR2.54-Y-LI-2P, OriginFootprint 7=HDR2.54-M-WS-2P, OriginFootprint 8=KF2510-LI-2P, OriginFootprint 9=XH2.54-WS-2P, OriginFootprint 10=XH2.54-LS-2P, OriginFootprint 11=KF2EDGK-2.54-LI-2P, OriginFootprint 12=KF2EDGK-2.54-WI-2P, OriginModelName=HDR2.54-1P, SymbolName="Header 2", UniqueId=fa82831371ccd6d5, 版权归属="封装库来自淘宝 ID：黄晶宝石", 联系售后=https://shop463601444.taobao.com
  JP5: AddInBom=yes, DesignItemID="Header 2", Device="Header 2", FootprintName=HDR2.54-LI-2P, LibraryName="5.4 - 接插件-脚距2.54 (100mil)", Origin Footprint=XH2.54-WI-2P, OriginFootprint 2=XH2.54-LI-2P, OriginFootprint 3=HDR2.54-M-LI-2P, OriginFootprint 4=HDR2.54-WI-2P, OriginFootprint 5=HDR2.54-WS-2P, OriginFootprint 6=HDR2.54-Y-LI-2P, OriginFootprint 7=HDR2.54-M-WS-2P, OriginFootprint 8=KF2510-LI-2P, OriginFootprint 9=XH2.54-WS-2P, OriginFootprint 10=XH2.54-LS-2P, OriginFootprint 11=KF2EDGK-2.54-LI-2P, OriginFootprint 12=KF2EDGK-2.54-WI-2P, OriginModelName=HDR2.54-1P, SymbolName="Header 2", UniqueId=6910556eac3a76a2, 版权归属="封装库来自淘宝 ID：黄晶宝石", 联系售后=https://shop463601444.taobao.com
  JP6: AddInBom=yes, DesignItemID="Header 2", Device="Header 2", FootprintName=HDR2.54-LI-2P, LibraryName="5.4 - 接插件-脚距2.54 (100mil)", Origin Footprint=XH2.54-WI-2P, OriginFootprint 2=XH2.54-LI-2P, OriginFootprint 3=HDR2.54-M-LI-2P, OriginFootprint 4=HDR2.54-WI-2P, OriginFootprint 5=HDR2.54-WS-2P, OriginFootprint 6=HDR2.54-Y-LI-2P, OriginFootprint 7=HDR2.54-M-WS-2P, OriginFootprint 8=KF2510-LI-2P, OriginFootprint 9=XH2.54-WS-2P, OriginFootprint 10=XH2.54-LS-2P, OriginFootprint 11=KF2EDGK-2.54-LI-2P, OriginFootprint 12=KF2EDGK-2.54-WI-2P, OriginModelName=HDR2.54-1P, SymbolName="Header 2", UniqueId=1e4a53fbbd604e66, 版权归属="封装库来自淘宝 ID：黄晶宝石", 联系售后=https://shop463601444.taobao.com
  JP7: AddInBom=yes, DesignItemID="Header 2", Device="Header 2", FootprintName=HDR2.54-LI-2P, LibraryName="5.4 - 接插件-脚距2.54 (100mil)", Origin Footprint=XH2.54-WI-2P, OriginFootprint 2=XH2.54-LI-2P, OriginFootprint 3=HDR2.54-M-LI-2P, OriginFootprint 4=HDR2.54-WI-2P, OriginFootprint 5=HDR2.54-WS-2P, OriginFootprint 6=HDR2.54-Y-LI-2P, OriginFootprint 7=HDR2.54-M-WS-2P, OriginFootprint 8=KF2510-LI-2P, OriginFootprint 9=XH2.54-WS-2P, OriginFootprint 10=XH2.54-LS-2P, OriginFootprint 11=KF2EDGK-2.54-LI-2P, OriginFootprint 12=KF2EDGK-2.54-WI-2P, OriginModelName=HDR2.54-1P, SymbolName="Header 2", UniqueId=6655918135225170, 版权归属="封装库来自淘宝 ID：黄晶宝石", 联系售后=https://shop463601444.taobao.com
  JP8: AddInBom=yes, DesignItemID="Header 2", Device="Header 2", FootprintName=HDR2.54-LI-2P, LibraryName="5.4 - 接插件-脚距2.54 (100mil)", Origin Footprint=XH2.54-WI-2P, OriginFootprint 2=XH2.54-LI-2P, OriginFootprint 3=HDR2.54-M-LI-2P, OriginFootprint 4=HDR2.54-WI-2P, OriginFootprint 5=HDR2.54-WS-2P, OriginFootprint 6=HDR2.54-Y-LI-2P, OriginFootprint 7=HDR2.54-M-WS-2P, OriginFootprint 8=KF2510-LI-2P, OriginFootprint 9=XH2.54-WS-2P, OriginFootprint 10=XH2.54-LS-2P, OriginFootprint 11=KF2EDGK-2.54-LI-2P, OriginFootprint 12=KF2EDGK-2.54-WI-2P, OriginModelName=HDR2.54-1P, SymbolName="Header 2", UniqueId=4577e3d3da87c365, 版权归属="封装库来自淘宝 ID：黄晶宝石", 联系售后=https://shop463601444.taobao.com
  JP9: AddInBom=yes, DesignItemID="Header 2", Device="Header 2", FootprintName=HDR2.54-LI-2P, LibraryName="5.4 - 接插件-脚距2.54 (100mil)", Origin Footprint=XH2.54-WI-2P, OriginFootprint 2=XH2.54-LI-2P, OriginFootprint 3=HDR2.54-M-LI-2P, OriginFootprint 4=HDR2.54-WI-2P, OriginFootprint 5=HDR2.54-WS-2P, OriginFootprint 6=HDR2.54-Y-LI-2P, OriginFootprint 7=HDR2.54-M-WS-2P, OriginFootprint 8=KF2510-LI-2P, OriginFootprint 9=XH2.54-WS-2P, OriginFootprint 10=XH2.54-LS-2P, OriginFootprint 11=KF2EDGK-2.54-LI-2P, OriginFootprint 12=KF2EDGK-2.54-WI-2P, OriginModelName=HDR2.54-1P, SymbolName="Header 2", UniqueId=85e96206a86bca40, 版权归属="封装库来自淘宝 ID：黄晶宝石", 联系售后=https://shop463601444.taobao.com
  JP10: AddInBom=yes, DesignItemID="Header 2", Device="Header 2", FootprintName=HDR2.54-LI-2P, LibraryName="5.4 - 接插件-脚距2.54 (100mil)", Origin Footprint=XH2.54-WI-2P, OriginFootprint 2=XH2.54-LI-2P, OriginFootprint 3=HDR2.54-M-LI-2P, OriginFootprint 4=HDR2.54-WI-2P, OriginFootprint 5=HDR2.54-WS-2P, OriginFootprint 6=HDR2.54-Y-LI-2P, OriginFootprint 7=HDR2.54-M-WS-2P, OriginFootprint 8=KF2510-LI-2P, OriginFootprint 9=XH2.54-WS-2P, OriginFootprint 10=XH2.54-LS-2P, OriginFootprint 11=KF2EDGK-2.54-LI-2P, OriginFootprint 12=KF2EDGK-2.54-WI-2P, OriginModelName=HDR2.54-1P, SymbolName="Header 2", UniqueId=ddeec7be49001c93, 版权归属="封装库来自淘宝 ID：黄晶宝石", 联系售后=https://shop463601444.taobao.com
  JP11: AddInBom=yes, DesignItemID="Header 2", Device="Header 2", FootprintName=HDR2.54-LI-2P, LibraryName="5.4 - 接插件-脚距2.54 (100mil)", Origin Footprint=XH2.54-WI-2P, OriginFootprint 2=XH2.54-LI-2P, OriginFootprint 3=HDR2.54-M-LI-2P, OriginFootprint 4=HDR2.54-WI-2P, OriginFootprint 5=HDR2.54-WS-2P, OriginFootprint 6=HDR2.54-Y-LI-2P, OriginFootprint 7=HDR2.54-M-WS-2P, OriginFootprint 8=KF2510-LI-2P, OriginFootprint 9=XH2.54-WS-2P, OriginFootprint 10=XH2.54-LS-2P, OriginFootprint 11=KF2EDGK-2.54-LI-2P, OriginFootprint 12=KF2EDGK-2.54-WI-2P, OriginModelName=HDR2.54-1P, SymbolName="Header 2", UniqueId=6d8656e8ed237838, 版权归属="封装库来自淘宝 ID：黄晶宝石", 联系售后=https://shop463601444.taobao.com
  JP12: AddInBom=yes, DesignItemID="Header 2", Device="Header 2", FootprintName=HDR2.54-LI-2P, LibraryName="5.4 - 接插件-脚距2.54 (100mil)", Origin Footprint=XH2.54-WI-2P, OriginFootprint 2=XH2.54-LI-2P, OriginFootprint 3=HDR2.54-M-LI-2P, OriginFootprint 4=HDR2.54-WI-2P, OriginFootprint 5=HDR2.54-WS-2P, OriginFootprint 6=HDR2.54-Y-LI-2P, OriginFootprint 7=HDR2.54-M-WS-2P, OriginFootprint 8=KF2510-LI-2P, OriginFootprint 9=XH2.54-WS-2P, OriginFootprint 10=XH2.54-LS-2P, OriginFootprint 11=KF2EDGK-2.54-LI-2P, OriginFootprint 12=KF2EDGK-2.54-WI-2P, OriginModelName=HDR2.54-1P, SymbolName="Header 2", UniqueId=fcba59359dd8e679, 版权归属="封装库来自淘宝 ID：黄晶宝石", 联系售后=https://shop463601444.taobao.com
  JP13: AddInBom=yes, DesignItemID="Header 2", Device="Header 2", FootprintName=HDR2.54-LI-2P, LibraryName="5.4 - 接插件-脚距2.54 (100mil)", Origin Footprint=XH2.54-WI-2P, OriginFootprint 2=XH2.54-LI-2P, OriginFootprint 3=HDR2.54-M-LI-2P, OriginFootprint 4=HDR2.54-WI-2P, OriginFootprint 5=HDR2.54-WS-2P, OriginFootprint 6=HDR2.54-Y-LI-2P, OriginFootprint 7=HDR2.54-M-WS-2P, OriginFootprint 8=KF2510-LI-2P, OriginFootprint 9=XH2.54-WS-2P, OriginFootprint 10=XH2.54-LS-2P, OriginFootprint 11=KF2EDGK-2.54-LI-2P, OriginFootprint 12=KF2EDGK-2.54-WI-2P, OriginModelName=HDR2.54-1P, SymbolName="Header 2", UniqueId=2c2198ed19c983b6, 版权归属="封装库来自淘宝 ID：黄晶宝石", 联系售后=https://shop463601444.taobao.com
  JP14: AddInBom=yes, DesignItemID="Header 2", Device="Header 2", FootprintName=HDR2.54-LI-2P, LibraryName="5.4 - 接插件-脚距2.54 (100mil)", Origin Footprint=XH2.54-WI-2P, OriginFootprint 2=XH2.54-LI-2P, OriginFootprint 3=HDR2.54-M-LI-2P, OriginFootprint 4=HDR2.54-WI-2P, OriginFootprint 5=HDR2.54-WS-2P, OriginFootprint 6=HDR2.54-Y-LI-2P, OriginFootprint 7=HDR2.54-M-WS-2P, OriginFootprint 8=KF2510-LI-2P, OriginFootprint 9=XH2.54-WS-2P, OriginFootprint 10=XH2.54-LS-2P, OriginFootprint 11=KF2EDGK-2.54-LI-2P, OriginFootprint 12=KF2EDGK-2.54-WI-2P, OriginModelName=HDR2.54-1P, SymbolName="Header 2", UniqueId=2a3f0cfc6900396e, 版权归属="封装库来自淘宝 ID：黄晶宝石", 联系售后=https://shop463601444.taobao.com
  JP15: AddInBom=yes, DesignItemID="Header 2", Device="Header 2", FootprintName=HDR2.54-LI-2P, LibraryName="5.4 - 接插件-脚距2.54 (100mil)", Origin Footprint=XH2.54-WI-2P, OriginFootprint 2=XH2.54-LI-2P, OriginFootprint 3=HDR2.54-M-LI-2P, OriginFootprint 4=HDR2.54-WI-2P, OriginFootprint 5=HDR2.54-WS-2P, OriginFootprint 6=HDR2.54-Y-LI-2P, OriginFootprint 7=HDR2.54-M-WS-2P, OriginFootprint 8=KF2510-LI-2P, OriginFootprint 9=XH2.54-WS-2P, OriginFootprint 10=XH2.54-LS-2P, OriginFootprint 11=KF2EDGK-2.54-LI-2P, OriginFootprint 12=KF2EDGK-2.54-WI-2P, OriginModelName=HDR2.54-1P, SymbolName="Header 2", UniqueId=57b57ccbe062354d, 版权归属="封装库来自淘宝 ID：黄晶宝石", 联系售后=https://shop463601444.taobao.com
  JP16: AddInBom=yes, DesignItemID="Header 2", Device="Header 2", FootprintName=HDR2.54-LI-2P, LibraryName="5.4 - 接插件-脚距2.54 (100mil)", Origin Footprint=XH2.54-WI-2P, OriginFootprint 2=XH2.54-LI-2P, OriginFootprint 3=HDR2.54-M-LI-2P, OriginFootprint 4=HDR2.54-WI-2P, OriginFootprint 5=HDR2.54-WS-2P, OriginFootprint 6=HDR2.54-Y-LI-2P, OriginFootprint 7=HDR2.54-M-WS-2P, OriginFootprint 8=KF2510-LI-2P, OriginFootprint 9=XH2.54-WS-2P, OriginFootprint 10=XH2.54-LS-2P, OriginFootprint 11=KF2EDGK-2.54-LI-2P, OriginFootprint 12=KF2EDGK-2.54-WI-2P, OriginModelName=HDR2.54-1P, SymbolName="Header 2", UniqueId=d84cd54a2cd93ea0, 版权归属="封装库来自淘宝 ID：黄晶宝石", 联系售后=https://shop463601444.taobao.com